# EAGLE board Stunning Maimu-Stantia (EAGLE 9.7.0)

Size 168.81 x 91.47 mm. Coordinates in mm from the lower left corner, seen from the top.
Outline: 0,0 168.81,0 168.81,91.47 0,91.47 0,0
Copper layers (1*16): Top 0.035mm / dielectric 1.5mm / Bottom 0.035mm
Design rules "default": minimum track width 6mil, minimum drill 0.35mm, track to track 6mil, track to pad 6mil, pad to pad 6mil, via to via 6mil, smd to smd 6mil, copper to edge 40mil, drill to drill 6mil, minimum pad ring 10mil, minimum via ring 8mil, stop-mask expansion 4mil, vias tented up to drill 0mil, thermal gap 10mil

## Footprints (pad centres in the part's own frame; a part is rotated, then mirrored left to right if it is on the bottom)
LEDRD254W60D565H860B = drill 0.981 pad 1.581: 1 -1.27,0; 2 1.27,0
RESAD1016W63L850D250B = drill 0.83 pad 1.43: 1 -5.08,0; 2 5.08,0
SWITCH-SPDT-PTH-8.5X3.7MM = drill 1.016 pad 1.88: 1 -2.54,0; 2 0,0; 3 2.54,0
TO220BV = drill 1.016 long: D 0,-2.54; G -2.54,-2.54; S 2.54,-2.54
ARDUINO-UNO-R3-SHIELD = drill 1.016 pad 1.88: 3.3V 24.13,-2.54; 5V 24.13,0; A0 24.13,12.7; A1 24.13,15.24; A2 24.13,17.78; A3 24.13,20.32; A4 24.13,22.86; A5 24.13,25.4; AREF -24.13,-13.97; D2 -24.13,20.32; D3 -24.13,17.78; D4 -24.13,15.24; D5 -24.13,12.7; D6 -24.13,10.16; D7 -24.13,7.62; D8 -24.13,3.81; D9 -24.13,1.27; D10 -24.13,-1.27; D11 -24.13,-3.81; D12 -24.13,-6.35; D13 -24.13,-8.89; GND@0 24.13,2.54; GND@1 24.13,5.08; GND@2 -24.13,-11.43; IOREF 24.13,-7.62; NC 24.13,-10.16; RES 24.13,-5.08; RX -24.13,25.4; SCL -24.13,-19.05; SDA -24.13,-16.51; TX -24.13,22.86; VIN 24.13,7.62

## Placement (x,y rotation side)
D1  RED  [LEDRD254W60D565H860B]  35.75,28.73 0 top
R1  330  [RESAD1016W63L850D250B]  48.2,30.79 180 top
R2  10k  [RESAD1016W63L850D250B]  80.07,59.44 90 top
R3  10k  [RESAD1016W63L850D250B]  69.91,59.44 90 top
S1  TOGGLE  [SWITCH-SPDT-PTH-8.5X3.7MM]  77.52,79.06 0 top
S2  TOGGLE  [SWITCH-SPDT-PTH-8.5X3.7MM]  67.59,82.88 330 top
T1  NMOSFET  [TO220BV]  18.85,71.27 0 top
T2  NMOSFET  [TO220BV]  8.51,72.14 0 top
TPMOS_1  PMOSFET  [TO220BV]  47.14,62.95 0 top
TPMOS_2  PMOSFET  [TO220BV]  34.69,63.28 0 top
U1  ARDUINO-UNO-R3-SHIELD  [ARDUINO-UNO-R3-SHIELD]  120.92,29.84 90 top

## Library data of the parts
D1 = Tinkercad; CATEGORY: Opto-Electronic; SUB-CATEGORY: LED; VALUE: LED_RED
R1-R3 S1 S2 U1 = Tinkercad
T1 T2 = Tinkercad; CATEGORY: Transistor; SUB-CATEGORY: MOSFET; TYPE: N-Channel
TPMOS_1 TPMOS_2 = Tinkercad; CATEGORY: Transistor; SUB-CATEGORY: MOSFET; TYPE: P-Channel

## Nets
D1_A: D1.1 T1.D T2.D TPMOS_2.D
D1_C: D1.2 R1.2
S1_P: S1.2 T1.G TPMOS_1.G
S1_S: R2.2 S1.3
S2_P: S2.2 T2.G TPMOS_2.G
S2_S: R3.2 S2.3
TPMOS_2_S: TPMOS_1.D TPMOS_2.S
U1_5V: S1.1 S2.1 TPMOS_1.S U1.5V
U1_GND: R1.1 R2.1 R3.1 T1.S T2.S U1.GND@0 U1.GND@1 U1.GND@2

## Tracks (layer width: path | path; a pad name or v marks a point on that pad's centre or on a via)
D1_A  (3 unrouted)
D1_C  (1 unrouted)
S1_P  (2 unrouted)
S1_S  (1 unrouted)
S2_P  (2 unrouted)
S2_S  (1 unrouted)
TPMOS_2_S  (1 unrouted)
U1_5V  (3 unrouted)
U1_GND  (7 unrouted)